# Altium PCB NB3000XN.PcbDoc (part 24 of 71)
Units mil, origin at the board's own origin, x right, y up, seen from the top; angles counter-clockwise.
Board outline 9527.56 x 6929.77 mil, 6 copper layers (Top Layer, GND+SHIELD, MidLayer1, MidLayer2, P2 - 3V3+5V0, Bottom Layer), stack 62.375 mil thick; 832 components, 1027 nets, 4655 pads, 4981 vias.
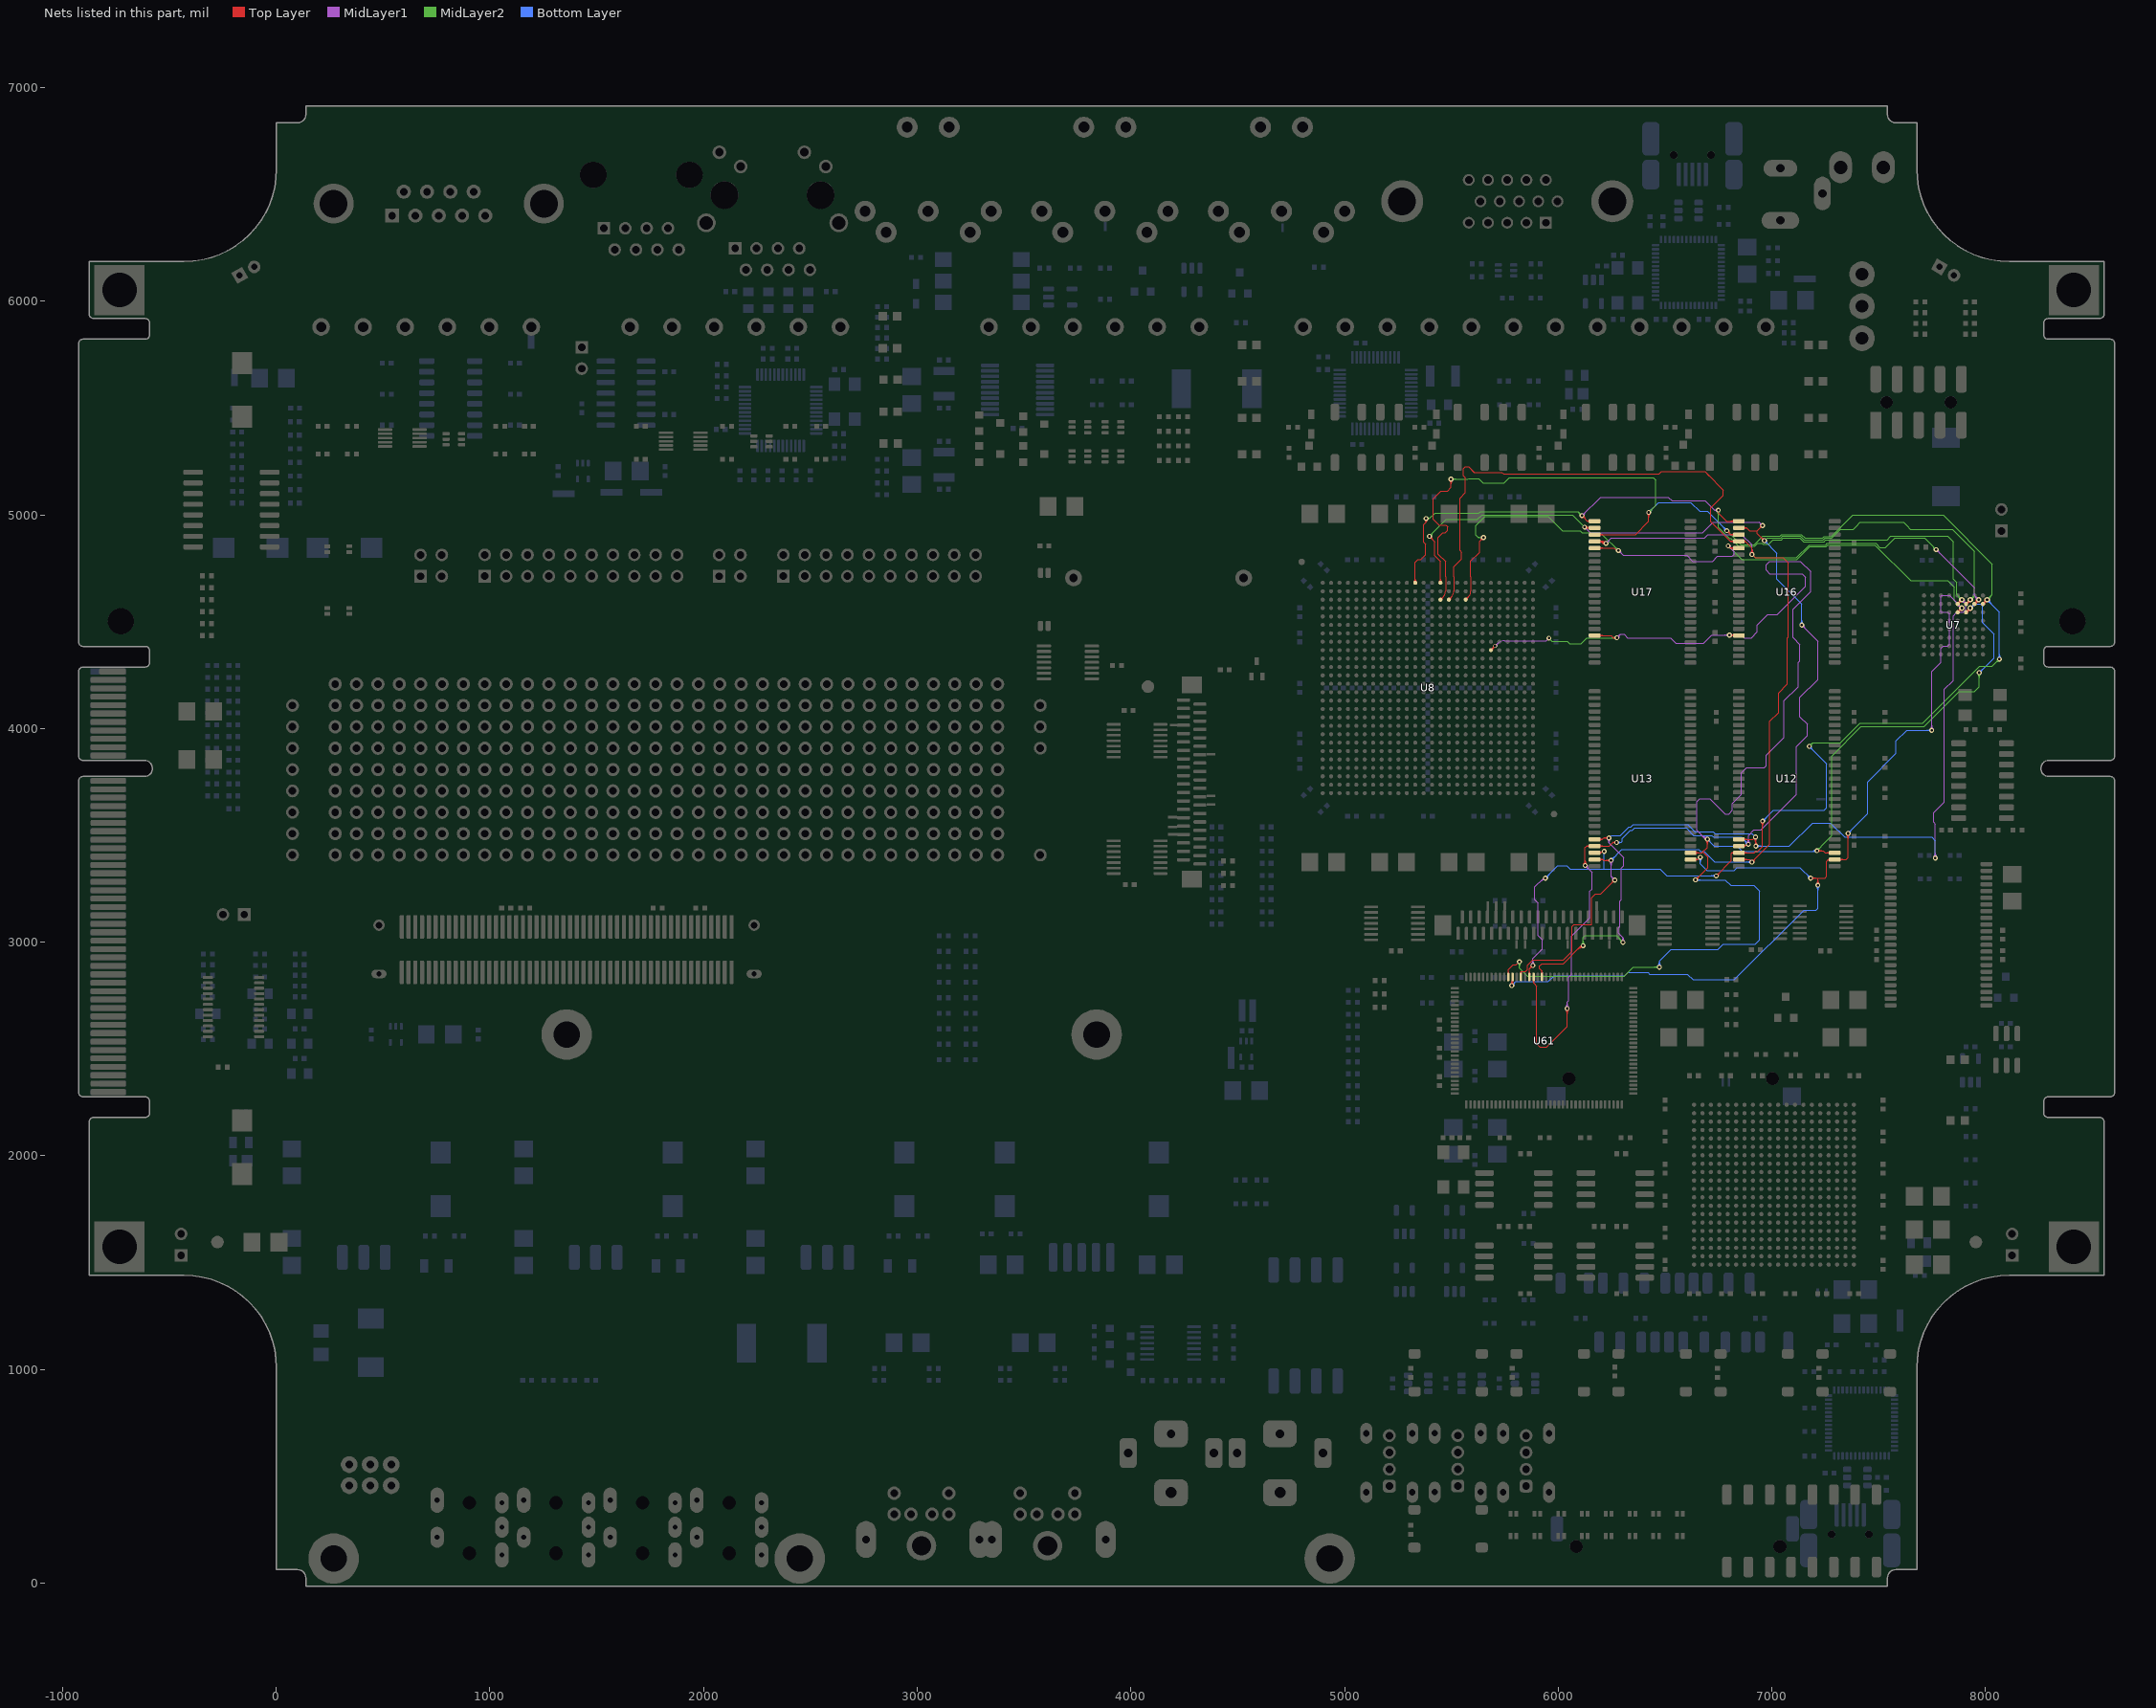
[diagram p28: the nets of this part, all layers, seen from the top]

## Via types
v1: diameter 23, hole 11.81, Top Layer to Bottom Layer, 3672 vias
v2: diameter 26, hole 11.81, Top Layer to Bottom Layer, 461 vias
v3: diameter 19, hole 11.81, Top Layer to Bottom Layer, tented both sides, 396 vias
v4: diameter 23.62, hole 11.81, Top Layer to Bottom Layer, 288 vias
v5: diameter 20, hole 11.81, Top Layer to Bottom Layer, 91 vias
v6: diameter 23, hole 11.81, Top Layer to Bottom Layer, tented both sides, 50 vias
v7: diameter 31, hole 11.81, Top Layer to Bottom Layer, 15 vias
v8: diameter 27.56, hole 11.81, Top Layer to Bottom Layer, tented both sides, 4 vias
v9: diameter 29, hole 11.81, Top Layer to Bottom Layer, 3 vias
v10: diameter 21, hole 11.81, Top Layer to Bottom Layer, 1 vias

## Nets (pads, with @x,y where several pads share a name; then routed paths per layer and width w, separated by ;. In a path a pad name is that pad's centre, name@x,y a point inside that pad or via, vN(x,y) a via of type N, cw(c..) or ccw(c..) an arc to the next point about the centre after c; other vN are vias at no path point) (continued)
DB_MEM.BUS_A2: U7.D2 U8.A12 U12.23 U13.23 U16.1 U17.1 U61.84 | length 9169.9
  Top Layer w4: U8.A12@5325.64,4687.43 ccw(c5312.84,4700.23) 5330.94,4700.23 ccw(c5349.05,4700.23) U8.A12@5336.25,4687.43 ; U8.A12@5325.75,4687.32 ccw(c5313.22,4699.85) 5330.94,4699.85 ccw(c5348.67,4699.85) U8.A12@5336.14,4687.32 ; U8.A12@5330.94,4682.13 5330.94,4710 5330.94,4720 5330.94,4724.74 5330.95,4728.71 5330.95,4778.21 5343.74,4791 5357.13,4791 5379.5,4813.37 5379.5,4863.42 5371.19,4871.73 5371.19,4955.04 5381.86,4965.71 ; v1@5376.62,4975.45 cw(c5370.18,4965.71) 5381.86,4965.71 ; v1(5381.86,4983.37) 5381.86,4965.71 ; v1@5387.1,4975.45 ccw(c5393.53,4965.71) 5381.86,4965.71 ; U61.84@5921.5,2853.36 ccw(c5914.67,2860.19) 5924.33,2860.19 ccw(c5933.99,2860.19) U61.84@5927.16,2853.36 ; U61.84@5924.33,2837.34 5924.33,2864.53 5913.36,2875.5 5913.36,2889.88 5916.78,2893.3 5923.52,2900.04 6024.52,2900.04 6107.86,2983.37 v1(6116.86,2983.37) ; 6085.28,2960.79 cw(c6116.86,2929.21) v1@6116.86,2973.87 ; 6092.1,2967.62 cw(c6116.86,2942.87) v1@6116.86,2977.87 ; 6098.93,2974.45 cw(c6116.86,2956.53) v1@6116.86,2981.87 ; v1@6111.52,4987.21 cw(c6111.52,4964.27) 6127.74,4980.49 cw(c6143.96,4996.71) v1@6121.02,4996.71 ; v1@6111.52,4991.21 cw(c6111.52,4977.93) 6120.91,4987.32 cw(c6130.3,4996.71) v1@6117.02,4996.71 ; v1(6111.52,4996.71) 6137.53,4970.71 ; U17.1@6146.51,4966.07 ccw(c6137.53,4959.68) 6137.53,4970.71 ; U17.1@6146.51,4975.34 cw(c6137.53,4981.73) 6137.53,4970.71 ; U13.23@6170.59,3481.54 6206.35,3481.53 ; U17.1@6170.59,4970.71 6137.53,4970.71 ; U13.23@6194.04,3476.13 cw(c6206.35,3464.83) 6206.35,3481.53 ; U13.23@6194.04,3486.94 ccw(c6206.35,3498.23) 6206.35,3481.53 ; v1@6231.14,3481.32 ccw(c6214.92,3465.11) 6214.92,3488.04 ccw(c6214.92,3510.98) v1@6231.14,3494.76 ; v1@6233.97,3484.15 ccw(c6224.58,3474.76) 6224.58,3488.04 ccw(c6224.58,3501.32) v1@6233.97,3491.93 ; v1(6237.86,3488.04) 6212.86,3488.04 6206.35,3481.53 ; v1(6749.52,5022.37) 6749.52,5008.37 6787.19,4970.71 U16.1@6845.59,4970.71 ; U16.1@6822.37,4965.05 ccw(c6808.72,4951.4) 6808.72,4970.71 ccw(c6808.72,4990.02) U16.1@6822.37,4976.37 ; U12.23@6845.59,3481.54 6912.35,3481.53 v1(6923.52,3492.71) 6923.52,3472 ; U12.23@6868.81,3475.88 cw(c6882.46,3462.22) 6882.46,3481.53 cw(c6882.46,3500.85) U12.23@6868.81,3487.19 ; v1@6917.33,3485.51 cw(c6905.71,3472) 6923.52,3472 ; v1@6919.53,3457.41 ccw(c6909.31,3470) 6925.52,3470 ccw(c6941.74,3470) v1@6931.51,3457.41 ; v1@6919.94,3488.54 cw(c6913.21,3480.72) 6923.52,3480.72 cw(c6933.84,3480.72) v1@6927.11,3488.54 ; v1@6922.06,3454.31 ccw(c6916.14,3461.6) 6925.52,3461.6 ccw(c6934.91,3461.6) v1@6928.99,3454.31 ; v1(6925.52,3450.04) 6925.52,3470 6923.52,3472 ; v1@6929.72,3485.51 ccw(c6941.34,3472) 6923.52,3472
  Top Layer w8: U7.D2@7869.69,4583.43 v2(7889.37,4603.11) ; U7.D2@7869.69,4589.43 ccw(c7869.69,4603.91) 7879.93,4593.67 ccw(c7890.17,4583.43) U7.D2@7875.69,4583.43 ; v2@7880.37,4603.11 cw(c7858.64,4603.11) 7874.01,4587.75 cw(c7889.37,4572.38) v2@7889.37,4594.11
  MidLayer1 w4: v1(6111.52,4996.71) 6198.19,5083.37 6515.19,5083.37 6531.86,5066.71 6687.21,5066.71 6731.54,5022.37 ; v1@6111.52,5002.21 ccw(c6111.52,5015.49) 6120.91,5006.1 ccw(c6130.3,4996.71) v1@6117.02,4996.71 ; v1@6111.52,5006.21 ccw(c6111.52,5029.14) 6127.74,5012.93 ccw(c6143.96,4996.71) v1@6121.02,4996.71 ; v1@6231.14,3481.32 cw(c6214.92,3465.11) 6237.86,3465.11 cw(c6260.79,3465.11) v1@6244.57,3481.32 ; v1@6233.97,3484.15 cw(c6224.58,3474.76) 6237.86,3474.76 cw(c6251.14,3474.76) v1@6241.75,3484.15 ; v1(6237.86,3488.04) 6237.86,3464.69 6307.52,3395.02 6307.52,3358.73 6295.52,3346.73 6295.52,3198.04 6289.19,3191.71 6289.19,3074.04 6281.86,3066.71 6281.86,3041.71 6303.52,3020.04 ; v1@6297.25,3006.18 ccw(c6285.07,3020.04) 6303.52,3020.04 ; v1@6299.89,3003.17 ccw(c6292.84,3011.2) 6303.52,3011.2 ccw(c6314.21,3011.2) v1@6307.16,3003.17 ; v1(6303.52,2999.04) 6303.52,3020.04 ; v1@6309.8,3006.18 cw(c6321.98,3020.04) 6303.52,3020.04 ; v1@6741.68,5017.02 ccw(c6731.54,5010.11) 6731.54,5022.37 ; v1@6741.68,5027.73 cw(c6731.54,5034.64) 6731.54,5022.37 ; v1(6749.52,5022.37) 6731.54,5022.37 ; v1@7758.47,3400.43 ccw(c7742.26,3416.64) 7765.19,3416.64 ccw(c7788.13,3416.64) v1@7771.91,3400.43 ; v1@7761.3,3397.6 ccw(c7751.91,3406.99) 7765.19,3406.99 ccw(c7778.47,3406.99) v1@7769.08,3397.6 ; v1(7765.19,3393.71) 7765.19,3553.69 7756.86,3562.02 7756.86,3606.02 7807.19,3656.35 7807.19,4184.02 7848.52,4225.36 7848.52,4528.04 7865.19,4544.71 7897.52,4544.71 7908.52,4555.71 7908.52,4583.96 v2(7889.37,4603.11) ; v2@7889.37,4592.11 cw(c7889.37,4565.55) 7908.15,4584.33 cw(c7926.93,4603.11) v2@7900.37,4603.11 ; v2@7889.37,4596.11 cw(c7889.37,4579.21) 7901.32,4591.16 cw(c7913.27,4603.11) v2@7896.37,4603.11
  MidLayer2 w4: v1(5381.86,4983.37) 5398.52,4983.37 ; v1@5390.03,4978.53 cw(c5398.52,4973.51) 5398.52,4983.37 ; v1@5390.03,4988.22 ccw(c5398.52,4993.24) 5398.52,4983.37 ; v1@6102.02,4996.71 ccw(c6079.09,4996.71) 6095.31,5012.93 ccw(c6111.52,5029.14) v1@6111.52,5006.21 ; v1@6106.02,4996.71 ccw(c6092.75,4996.71) 6102.14,5006.1 ccw(c6111.52,5015.49) v1@6111.52,5002.21 ; v1@6110.14,2990.09 ccw(c6093.92,3006.31) 6116.86,3006.31 ccw(c6139.79,3006.31) v1@6123.57,2990.09 ; v1(6111.52,4996.71) 6092.03,5016.2 5636.1,5016.2 5628.27,5008.37 5423.52,5008.37 5398.52,4983.37 ; v1@6112.97,2987.26 ccw(c6103.58,2996.65) 6116.86,2996.65 ccw(c6130.14,2996.65) v1@6120.75,2987.26 ; v1(6116.86,2983.37) 6116.86,3021.86 6125,3030 6272.56,3030 v1(6303.52,2999.04) ; v1@6294.02,2999.04 ccw(c6271.09,2999.04) 6287.31,3015.26 ccw(c6303.52,3031.48) v1@6303.52,3008.54 ; v1@6298.02,2999.04 ccw(c6284.75,2999.04) 6294.14,3008.43 ccw(c6303.52,3017.82) v1@6303.52,3004.54 ; v1@6742.81,5015.66 cw(c6726.59,4999.44) 6749.52,4999.44 cw(c6772.46,4999.44) v1@6756.24,5015.66 ; v1@6745.64,5018.49 cw(c6736.25,5009.1) 6749.52,5009.1 cw(c6762.8,5009.1) v1@6753.41,5018.49 ; v1(6749.52,5022.37) 6749.52,4940.71 6801.36,4888.87 6809.4,4888.87 6845.07,4853.21 6920.73,4853.21 6934.23,4866.71 6953.54,4866.71 6957.75,4862.5 6985,4862.5 7006.38,4883.88 7044.62,4883.88 7053.28,4892.54 7130.67,4892.54 7148,4875.21 7244.15,4875.21 7252.15,4883.21 7540.02,4883.21 7540.19,4883.37 7556.86,4900.04 7823.52,4900.04 7848.52,4875.04 7848.52,4700.04 7865.19,4683.37 7865.19,4627.29 v2(7889.37,4603.11) ; v2@7878.37,4603.11 ccw(c7851.82,4603.11) 7870.59,4621.89 ccw(c7889.37,4640.67) v2@7889.37,4614.11 ; v2@7882.37,4603.11 ccw(c7865.47,4603.11) 7877.42,4615.06 ccw(c7889.37,4627.01) v2@7889.37,4610.11
  Bottom Layer w4: v1(6237.86,3488.04) 6249.86,3500.04 6291.19,3500.04 6330.86,3539.71 6340,3539.71 6350.67,3550.37 6606.52,3550.37 6640.19,3516.71 6725.52,3516.71 6733.86,3508.37 6907.86,3508.37 v1(6923.52,3492.71) ; v1(6925.52,3450.04) 7081.86,3450.04 7190.19,3558.37 7273.52,3558.37 7340.19,3491.71 7748.52,3491.71 7765.19,3475.04 v1(7765.19,3393.71) ; v1@6929.41,3446.15 cw(c6938.8,3436.76) 6938.8,3450.04 cw(c6938.8,3463.32) v1@6929.41,3453.93 ; v1@6932.24,3443.32 cw(c6948.46,3427.11) 6948.46,3450.04 cw(c6948.46,3472.98) v1@6932.24,3456.76 ; v1@7758.47,3400.43 ccw(c7742.26,3416.64) 7765.19,3416.64 ccw(c7788.13,3416.64) v1@7771.91,3400.43 ; v1@7761.3,3397.6 ccw(c7751.91,3406.99) 7765.19,3406.99 ccw(c7778.47,3406.99) v1@7769.08,3397.6
DB_MEM.BUS_A3: U7.C2 U8.A15 U12.24 U13.24 U16.2 U17.2 U61.86 | length 8910.3
  Top Layer w4: v1@5397.19,4890.54 cw(c5397.19,4867.61) 5413.41,4883.82 cw(c5429.63,4900.04) v1@5406.69,4900.04 ; v1@5397.19,4894.54 cw(c5397.19,4881.26) 5406.58,4890.65 cw(c5415.97,4900.04) v1@5402.69,4900.04 ; v1(5397.19,4900.04) 5422.5,4874.73 5422.5,4809.73 5449.06,4783.17 5449.06,4720 5449.06,4710 U8.A15@5449.06,4682.13 ; U8.A15@5443.75,4687.43 ccw(c5430.95,4700.23) 5449.06,4700.23 ccw(c5467.16,4700.23) U8.A15@5454.36,4687.43 ; U8.A15@5443.86,4687.32 ccw(c5431.33,4699.85) 5449.06,4699.85 ccw(c5466.78,4699.85) U8.A15@5454.25,4687.32 ; U61.86@5882.13,2821.32 cw(c5875.3,2814.49) 5884.96,2814.49 cw(c5894.62,2814.49) U61.86@5887.79,2821.32 ; U61.86@5884.96,2837.34 5884.96,2808.37 5898.52,2794.81 5898.52,2525.04 5915.19,2508.37 5945.54,2508.37 6041.86,2604.69 v1(6041.86,2689.71) ; v1@6035.14,2682.99 cw(c6018.92,2666.77) 6041.86,2666.77 cw(c6064.79,2666.77) v1@6048.57,2682.99 ; v1@6037.97,2685.82 cw(c6028.58,2676.43) 6041.86,2676.43 cw(c6055.14,2676.43) v1@6045.75,2685.82 ; v1@6119.47,3366.09 ccw(c6103.26,3382.31) 6126.19,3382.31 ccw(c6149.13,3382.31) v1@6132.91,3366.09 ; v1@6122.3,3363.26 ccw(c6112.91,3372.65) 6126.19,3372.65 ccw(c6139.47,3372.65) v1@6130.08,3363.26 ; v1(6123.52,4943.04) 6127.35,4939.21 U17.2@6170.59,4939.21 ; v1@6124.58,4944.1 ccw(c6136.38,4955.9) 6136.38,4939.21 ; v1(6126.19,3359.37) 6126.19,3443.04 6133.19,3450.04 6240.19,3450.04 6256.86,3466.71 ; v1@6127.41,4946.93 ccw(c6146.04,4965.56) U17.2@6146.04,4939.21 ; v1@6130.24,4936.32 cw(c6137.22,4929.34) 6137.22,4939.21 ; v1@6130.24,4949.76 ccw(c6155.7,4975.21) U17.2@6155.7,4939.21 ; U13.24@6147.37,3444.38 ccw(c6133.72,3430.73) 6133.72,3450.04 ccw(c6133.72,3469.35) U13.24@6147.37,3455.7 ; U17.2@6147.37,4933.56 ccw(c6133.72,4919.9) 6133.72,4939.21 ccw(c6133.72,4958.53) U17.2@6147.37,4944.87 ; U13.24@6193.81,3444.38 cw(c6207.46,3430.73) 6207.46,3450.04 cw(c6207.46,3469.35) U13.24@6193.81,3455.7 ; v1@6265.35,3461.87 ccw(c6256.86,3456.84) 6256.86,3466.71 ; v1@6265.35,3471.55 cw(c6256.86,3476.58) 6256.86,3466.71 ; v1(6273.52,3466.71) 6256.86,3466.71 ; U12.24@6845.59,3450.04 6874.19,3450.04 ; U16.2@6845.59,4939.21 6881.15,4939.21 ; U12.24@6863.15,3450.04 ccw(c6868.51,3458.36) 6875.51,3451.36 ; U12.24@6865.32,3453.4 ccw(c6871.26,3462.63) 6879.02,3454.87 ; U12.24@6867.48,3456.77 ccw(c6874.01,3466.89) v1@6882.52,3458.37 ; U16.2@6869.09,4933.85 cw(c6881.15,4922.96) 6881.15,4939.21 ; U16.2@6869.09,4944.57 ccw(c6881.15,4955.46) 6881.15,4939.21 ; U12.24@6870.75,3447.55 cw(c6874.19,3446.42) 6874.19,3450.04 ; U12.24@6870.75,3452.53 ccw(c6874.19,3453.65) 6874.19,3450.04 ; 6874.65,3450.5 cw(c6883.5,3441.64) v1@6888.15,3453.27 ; 6878.94,3454.79 cw(c6885.95,3447.77) v1@6889.63,3456.98 ; v1(6890.19,3458.37) v1@6882.52,3458.37 ; v1@6947.36,4950.04 cw(c6924.42,4950.04) 6940.64,4933.82 cw(c6956.86,4917.61) v1@6956.86,4940.54 ; v1@6951.36,4950.04 cw(c6938.08,4950.04) 6947.47,4940.65 cw(c6956.86,4931.26) v1@6956.86,4944.54 ; v1@6955.5,4880 ccw(c6932.56,4880) 6948.78,4896.22 ccw(c6965,4912.43) v1@6965,4889.5 ; v1(6956.86,4950.04) 6931.86,4925.04 ; v1@6959.5,4880 ccw(c6946.22,4880) 6955.61,4889.39 ccw(c6965,4898.78) v1@6965,4885.5 ; v1(6965,4880) 6931.86,4913.14 6931.86,4925.04 ; 6874.19,3450.04 v1@6882.52,3458.37 ; 6881.15,4939.21 6895.32,4925.04 6931.86,4925.04
  Top Layer w8: U7.C2@7909.06,4583.43 v2(7928.74,4603.11) ; U7.C2@7909.06,4589.43 ccw(c7909.06,4603.91) 7919.3,4593.67 ccw(c7929.54,4583.43) U7.C2@7915.06,4583.43 ; v2@7919.74,4603.11 cw(c7898.01,4603.11) 7913.38,4587.75 cw(c7928.74,4572.38) v2@7928.74,4594.11
  MidLayer1 w4: v1@6035.14,2696.43 ccw(c6018.92,2712.64) 6041.86,2712.64 ccw(c6064.79,2712.64) v1@6048.57,2696.43 ; v1@6037.97,2693.6 ccw(c6028.58,2702.99) 6041.86,2702.99 ccw(c6055.14,2702.99) v1@6045.75,2693.6 ; v1(6041.86,2689.71) 6041.86,2720.75 6048.52,2727.41 6048.52,2835.71 6062.86,2850.04 6062.86,3028.35 6148.52,3114.02 6148.52,3238.67 6158.19,3248.34 6158.19,3327.37 v1(6126.19,3359.37) ; v1@6123.52,4933.54 cw(c6123.52,4910.61) 6139.74,4926.82 cw(c6155.96,4943.04) v1@6133.02,4943.04 ; v1@6123.52,4937.54 cw(c6123.52,4924.26) 6132.91,4933.65 cw(c6142.3,4943.04) v1@6129.02,4943.04 ; v1(6123.52,4943.04) 6149.86,4916.71 6675.88,4916.71 6725.88,4966.71 6940.19,4966.71 v1(6956.86,4950.04) ; v1@6126.19,3349.87 cw(c6126.19,3326.94) 6142.41,3343.16 cw(c6158.63,3359.37) v1@6135.69,3359.37 ; v1@6126.19,3353.87 cw(c6126.19,3340.6) 6135.58,3349.99 cw(c6144.97,3359.37) v1@6131.69,3359.37 ; v1@6883.47,3465.09 ccw(c6867.26,3481.31) 6890.19,3481.31 ccw(c6913.13,3481.31) v1@6896.91,3465.09 ; v1@6886.3,3462.26 ccw(c6876.91,3471.65) 6890.19,3471.65 ccw(c6903.47,3471.65) v1@6894.08,3462.26 ; v1(6890.19,3458.37) 6890.19,3500.04 6915.19,3525.04 6948.52,3525.04 7115.19,3691.71 7115.19,3916.35 7165.52,3966.69 7165.52,4020.79 7131.86,4054.46 7131.86,4146.45 7215.19,4229.79 7215.19,4409.37 v1(7140.19,4484.37) ; v1@6947.36,4950.04 ccw(c6924.42,4950.04) 6940.64,4966.26 ccw(c6956.86,4982.48) v1@6956.86,4959.54 ; v1@6951.36,4950.04 ccw(c6938.08,4950.04) 6947.47,4959.43 ccw(c6956.86,4968.82) v1@6956.86,4955.54 ; v1@7140.19,4474.87 cw(c7140.19,4451.94) 7156.41,4468.16 cw(c7172.63,4484.37) v1@7149.69,4484.37 ; v1@7140.19,4478.87 cw(c7140.19,4465.6) 7149.58,4474.99 cw(c7158.97,4484.37) v1@7145.69,4484.37
  MidLayer2 w4: v1(5397.19,4900.04) 5476.52,4979.37 5621.9,4979.37 5642.73,5000.2 6039.8,5000.2 ; v1@5397.19,4905.54 ccw(c5397.19,4918.82) 5406.58,4909.43 ccw(c5415.97,4900.04) v1@5402.69,4900.04 ; v1@5397.19,4909.54 ccw(c5397.19,4932.48) 5413.41,4916.26 ccw(c5429.63,4900.04) v1@5406.69,4900.04 ; 6040,5000 6039.8,5000.2 ; v1(6123.52,4943.04) 6066.36,5000.2 6039.8,5000.2 ; v1(6965,4880) 6978.04,4893.04 7042.47,4893.04 7049.97,4900.54 7133.98,4900.54 7151.31,4883.21 7240.84,4883.21 7248.84,4891.21 7281.26,4891.21 7322.09,4932.04 7380.52,4932.04 7398.52,4950.04 ; 7396.8,4948.32 7413.48,4965 7616.9,4965 7631.86,4950.04 7648.52,4933.37 7845.54,4933.37 7948.52,4830.39 7948.52,4622.89 v2(7928.74,4603.11) ; v2@7928.74,4610.11 ccw(c7928.74,4627.01) 7940.69,4615.06 ccw(c7952.64,4603.11) v2@7935.74,4603.11 ; v2@7928.74,4614.11 ccw(c7928.74,4640.67) 7947.52,4621.89 ccw(c7966.3,4603.11) v2@7939.74,4603.11
  Bottom Layer w4: v1(6273.52,3466.71) 6295.52,3466.71 ; v1@6277.53,3462.94 cw(c6286.26,3454.71) 6286.26,3466.71 cw(c6286.26,3478.7) v1@6277.53,3470.48 ; v1@6280.44,3460.19 cw(c6295.52,3445.99) 6295.52,3466.71 ; v1@6280.44,3473.22 ccw(c6295.52,3487.43) 6295.52,3466.71 ; v1@6880.69,3458.37 ccw(c6857.76,3458.37) 6873.97,3474.59 ccw(c6890.19,3490.81) v1@6890.19,3467.87 ; v1@6884.69,3458.37 ccw(c6871.41,3458.37) 6880.8,3467.76 ccw(c6890.19,3477.15) v1@6890.19,3463.87 ; v1(6890.19,3458.37) 6856.86,3491.71 6727.9,3491.71 6719.56,3500.04 6634.23,3500.04 6599.9,3534.37 6357.29,3534.37 6346.63,3523.71 6337.48,3523.71 6300.21,3486.43 6300.21,3471.39 6295.52,3466.71 ; v1@6965,4870.5 cw(c6965,4847.56) 6981.22,4863.78 cw(c6997.43,4880) v1@6974.5,4880 ; v1(6965,4880) 7023.52,4821.48 7023.52,4700.37 7140.19,4583.71 v1(7140.19,4484.37) ; v1@7133.47,4491.09 ccw(c7117.26,4507.31) 7140.19,4507.31 ccw(c7163.13,4507.31) v1@7146.91,4491.09 ; v1@7136.3,4488.26 ccw(c7126.91,4497.65) 7140.19,4497.65 ccw(c7153.47,4497.65) v1@7144.08,4488.26 ; 6974.39,4870.61 cw(c6983.78,4880) 6970.5,4880 ccw(c6983.78,4880) 6974.39,4870.61 ; 6974.39,4870.61 ccw(c6965,4861.22) 6965,4874.5 cw(c6965,4861.22) 6974.39,4870.61
DB_MEM.BUS_A4: U7.A2 U8.C15 U12.25 U13.25 U16.3 U17.3 U61.87 | length 9796.5
  Top Layer w4: U8.C15@5449.06,4610.73 ccw(c5449.06,4628.45) 5461.59,4615.92 ; U8.C15@5456.4,4603.39 cw(c5474.12,4603.39) 5461.59,4615.92 ; 5472.92,4773.31 5472.92,4765 ; v1@5491.81,5160.99 cw(c5475.59,5144.77) 5498.52,5144.77 cw(c5521.46,5144.77) v1@5505.24,5160.99 ; v1@5494.64,5163.82 cw(c5485.25,5154.43) 5498.52,5154.43 cw(c5511.8,5154.43) v1@5502.41,5163.82 ; v1@5498.52,5158.37 v1(5498.52,5167.71) 5498.52,5128.52 5481.75,5111.75 5451.9,5111.75 5415.19,5075.04 5415.19,4978.71 5441.52,4952.37 5441.65,4952.5 5474.4,4952.5 5474.52,4952.37 5481.86,4945.04 5482.5,4944.4 5482.5,4927.75 5470.75,4916 5461.15,4916 5438.86,4893.71 5438.86,4816 5472.92,4781.94 5472.92,4765 ; U61.87@5862.45,2853.36 ccw(c5855.82,2859.98) 5865.19,2859.98 ; 5864.86,2874.71 cw(c5881.36,2858.2) v1@5881.71,2881.54 ; U61.87@5865.19,2850.53 5865.19,2875.04 5881.19,2891.04 v1(5881.86,2891.04) ; 5865.19,2860.39 ccw(c5875.14,2860.39) U61.87@5868.1,2853.36 ; 5866.11,2875.96 ccw(c5851.03,2891.04) v1@5872.36,2891.04 ; 5871.54,2881.39 cw(c5881.56,2871.38) v1@5881.77,2885.54 ; 5872.94,2882.79 ccw(c5864.69,2891.04) v1@5876.36,2891.04 ; U13.25@6170.59,3418.54 6200,3418.54 ; U17.3@6170.59,4907.72 6361.55,4907.72 6423.86,4970.02 v1(6423.86,5012.04) ; U13.25@6188.15,3418.54 ccw(c6194.06,3425.34) 6200.43,3418.97 ; U13.25@6190.77,3421.56 ccw(c6196.88,3428.59) 6203.46,3422.01 ; U13.25@6193.4,3424.58 ccw(c6199.7,3431.84) v1@6206.5,3425.04 ; U17.3@6193.81,4902.06 cw(c6207.46,4888.4) 6207.46,4907.72 cw(c6207.46,4927.03) U17.3@6193.81,4913.37 ; U13.25@6195.57,3415.55 cw(c6200,3413.77) 6200,3418.54 ; U13.25@6195.57,3421.53 ccw(c6200,3423.32) 6200,3418.54 ; v1(6215.19,3425.04) v1@6206.5,3425.04 ; v1@6417.14,5005.32 cw(c6400.92,4989.11) 6423.86,4989.11 cw(c6446.79,4989.11) v1@6430.57,5005.32 ; v1@6419.97,5008.15 cw(c6410.58,4998.76) 6423.86,4998.76 cw(c6437.14,4998.76) v1@6427.75,5008.15 ; v1(6740.19,3310.71) 6811.52,3382.04 6811.52,3416.88 6813.19,3418.54 ; v1@6740.19,3316.21 ccw(c6740.19,3329.49) 6749.58,3320.1 ccw(c6758.97,3310.71) v1@6745.69,3310.71 ; v1@6740.19,3320.21 ccw(c6740.19,3343.14) 6756.41,3326.93 ccw(c6772.63,3310.71) v1@6749.69,3310.71 ; v1@6789.52,4916.87 cw(c6789.52,4893.94) 6805.74,4910.16 cw(c6821.96,4926.37) v1@6799.02,4926.37 ; v1@6789.52,4920.87 cw(c6789.52,4907.6) 6798.91,4916.99 cw(c6808.3,4926.37) v1@6795.02,4926.37 ; v1(6789.52,4926.37) 6808.18,4907.72 U16.3@6845.59,4907.72 ; U12.25@6821.35,3422.94 cw(c6813.19,3428.31) 6813.19,3418.54 ; U12.25@6821.35,3414.15 ccw(c6813.19,3408.78) 6813.19,3418.54 ; U16.3@6822.37,4902.06 ccw(c6808.72,4888.4) 6808.72,4907.72 ccw(c6808.72,4927.03) U16.3@6822.37,4913.37 ; U12.25@6868.81,3412.89 cw(c6882.46,3399.23) 6882.46,3418.54 cw(c6882.46,3437.86) U12.25@6868.81,3424.2 ; v1@6950.14,3559.99 cw(c6933.92,3543.77) 6956.86,3543.77 cw(c6979.79,3543.77) v1@6963.57,3559.99 ; v1@6952.97,3562.82 cw(c6943.58,3553.43) 6956.86,3553.43 cw(c6970.14,3553.43) v1@6960.75,3562.82 ; v1(6956.86,3566.71) 6956.86,3448.37 6933.52,3425.04 6923.52,3425.04 6917.03,3418.54 U12.25@6845.59,3418.54 6813.19,3418.54 ; 5461.59,4615.92 ccw(c5434.24,4643.27) 5472.92,4643.27 5472.92,4710 5472.92,4720 5472.92,4765 ; 6200,3418.54 v1@6206.5,3425.04
  Top Layer w8: U7.A2@7987.8,4583.43 v2(8007.48,4603.11) ; U7.A2@7987.8,4589.43 ccw(c7987.8,4603.91) 7998.04,4593.67 ccw(c8008.28,4583.43) U7.A2@7993.8,4583.43 ; v2@7998.48,4603.11 cw(c7976.75,4603.11) 7992.12,4587.75 cw(c8007.48,4572.38) v2@8007.48,4594.11
  MidLayer1 w4: v1@5875.14,2897.76 ccw(c5858.92,2913.98) 5881.86,2913.98 ccw(c5904.79,2913.98) v1@5888.57,2897.76 ; v1@5877.97,2894.93 ccw(c5868.58,2904.32) 5881.86,2904.32 ccw(c5895.14,2904.32) v1@5885.75,2894.93 ; v1(5881.86,2891.04) 5881.86,2923.37 5926.19,2967.71 5926.19,3011.06 5906.19,3031.06 5906.19,3182.67 5890.86,3198 5890.86,3259.04 5931.86,3300.04 v1(5940.19,3300.04) ; 5909.75,3277.93 cw(c5940.19,3247.49) v1@5940.19,3290.54 ; 5916.58,3284.76 cw(c5940.19,3261.14) v1@5940.19,3294.54 ; 5923.4,3291.59 cw(c5940.19,3274.8) v1@5940.19,3298.54
  MidLayer2 w4: v1(5498.52,5167.71) 5577.71,5167.71 5580,5170 5628.56,5170 5648.52,5150.04 5746.86,5150.04 5771.86,5175.04 6445.54,5175.04 6457.19,5163.39 6457.19,5045.37 v1(6423.86,5012.04) ; v1@5502.41,5163.82 cw(c5511.8,5154.43) 5511.8,5167.71 cw(c5511.8,5180.99) v1@5502.41,5171.6 ; v1@5505.24,5160.99 cw(c5521.46,5144.77) 5521.46,5167.71 cw(c5521.46,5190.64) v1@5505.24,5174.43 ; v1@6423.86,5017.54 ccw(c6423.86,5030.82) 6433.25,5021.43 ccw(c6442.64,5012.04) v1@6429.36,5012.04 ; v1@6423.86,5021.54 ccw(c6423.86,5044.48) 6440.07,5028.26 ccw(c6456.29,5012.04) v1@6433.36,5012.04 ; v1@6789.52,4916.87 cw(c6789.52,4893.94) 6805.74,4910.16 cw(c6821.96,4926.37) v1@6799.02,4926.37 ; v1@6789.52,4920.87 cw(c6789.52,4907.6) 6798.91,4916.99 cw(c6808.3,4926.37) v1@6795.02,4926.37 ; v1(6789.52,4926.37) 6854.69,4861.21 6917.42,4861.21 6957.25,4901.04 7039.15,4901.04 ; v1(7174.86,3916.71) 7191.52,3933.37 7295,3933.37 7306.86,3933.37 7320.54,3933.37 7412.21,4025.04 7460,4025.04 7706.86,4025.04 7973.52,4291.71 8031.86,4291.71 v1(8065.19,4325.04) ; v1@7174.86,3922.21 ccw(c7174.86,3935.49) 7184.25,3926.1 ccw(c7193.64,3916.71) v1@7180.36,3916.71 ; v1@7174.86,3926.21 ccw(c7174.86,3949.14) 7191.07,3932.93 ccw(c7207.29,3916.71) v1@7184.36,3916.71 ; v2(8007.48,4603.11) 8031.86,4627.49 8031.86,4769.69 7801.5,5000.04 7378.78,5000.04 7277.94,4899.21 7245.52,4899.21 7237.52,4891.21 7154.63,4891.21 7137.29,4908.54 7046.65,4908.54 7041.11,4903 ; v2@8007.48,4610.11 ccw(c8007.48,4627.01) 8019.43,4615.06 ccw(c8031.38,4603.11) v2@8014.48,4603.11 ; v2@8007.48,4614.11 ccw(c8007.48,4640.67) 8026.26,4621.89 ccw(c8045.03,4603.11) v2@8018.48,4603.11 ; v1@8055.69,4325.04 cw(c8032.76,4325.04) 8048.97,4308.82 cw(c8065.19,4292.61) v1@8065.19,4315.54 ; v1@8059.69,4325.04 cw(c8046.41,4325.04) 8055.8,4315.65 cw(c8065.19,4306.26) v1@8065.19,4319.54 ; 7039.15,4901.04 7041.11,4903 ; 7039.15,4901.04 7041.11,4903
  Bottom Layer w4: v1(5940.19,3300.04) 5998.52,3358.37 6040.19,3358.37 6056.86,3341.71 6215.19,3341.71 ; v1@5940.19,3305.54 ccw(c5940.19,3318.82) 5949.58,3309.43 ccw(c5958.97,3300.04) v1@5945.69,3300.04 ; v1@5940.19,3309.54 ccw(c5940.19,3332.48) 5956.41,3316.26 ccw(c5972.63,3300.04) v1@5949.69,3300.04 ; v1(6215.19,3425.04) 6215.19,3341.71 ; v1(6423.86,5012.04) 6470.19,5058.37 6621.21,5058.37 6662.88,5016.71 6699.19,5016.71 v1(6789.52,4926.37) ; v1@6423.86,5017.54 ccw(c6423.86,5030.82) 6433.25,5021.43 ccw(c6442.64,5012.04) v1@6429.36,5012.04 ; v1@6423.86,5021.54 ccw(c6423.86,5044.48) 6440.07,5028.26 ccw(c6456.29,5012.04) v1@6433.36,5012.04 ; v1@6733.47,3303.99 ccw(c6717.26,3287.77) 6717.26,3310.71 ccw(c6717.26,3333.64) v1@6733.47,3317.43 ; v1@6736.3,3306.82 ccw(c6726.91,3297.43) 6726.91,3310.71 ccw(c6726.91,3323.99) v1@6736.3,3314.6 ; v1(6740.19,3310.71) 6508.61,3310.71 6477.61,3341.71 6215.19,3341.71 ; v1@6780.02,4926.37 ccw(c6757.09,4926.37) 6773.31,4942.59 ccw(c6789.52,4958.81) v1@6789.52,4935.87 ; v1@6784.02,4926.37 ccw(c6770.75,4926.37) 6780.14,4935.76 ccw(c6789.52,4945.15) v1@6789.52,4931.87 ; v1(6956.86,3566.71) 7006.86,3616.71 7245.54,3616.71 7257.19,3628.35 7257.19,3834.37 v1(7174.86,3916.71) ; v1@6956.86,3572.21 ccw(c6956.86,3585.49) 6966.25,3576.1 ccw(c6975.64,3566.71) v1@6962.36,3566.71 ; v1@6956.86,3576.21 ccw(c6956.86,3599.14) 6973.07,3582.93 ccw(c6989.29,3566.71) v1@6966.36,3566.71 ; v1@7174.86,3907.21 cw(c7174.86,3884.27) 7191.07,3900.49 cw(c7207.29,3916.71) v1@7184.36,3916.71 ; v1@7174.86,3911.21 cw(c7174.86,3897.93) 7184.25,3907.32 cw(c7193.64,3916.71) v1@7180.36,3916.71 ; v2@8007.48,4592.11 cw(c8007.48,4565.55) 8026.26,4584.33 cw(c8045.04,4603.11) v2@8018.48,4603.11 ; v2@8007.48,4596.11 cw(c8007.48,4579.21) 8019.43,4591.16 cw(c8031.38,4603.11) v2@8014.48,4603.11 ; v2(8007.48,4603.11) 8065.19,4545.4 v1(8065.19,4325.04) ; v1@8058.47,4331.76 ccw(c8042.26,4347.98) 8065.19,4347.98 ccw(c8088.13,4347.98) v1@8071.91,4331.76 ; v1@8061.3,4328.93 ccw(c8051.91,4338.32) 8065.19,4338.32 ccw(c8078.47,4338.32) v1@8069.08,4328.93
DB_MEM.BUS_A5: U7.B2 U8.C16 U12.26 U13.26 U16.4 U17.4 U61.89 | length 9055.1
  Top Layer w4: U8.C16@5488.43,4610.73 ccw(c5488.43,4628.45) 5500.96,4615.92 ; U8.C16@5495.77,4603.39 cw(c5513.49,4603.39) 5500.96,4615.92 ; 5606.86,5199.37 5581.19,5225.04 ; 5770.63,5191.37 5791,5191.37 ; U61.89@5823.08,2853.36 ccw(c5816.25,2860.19) 5825.91,2860.19 ccw(c5835.56,2860.19) U61.89@5828.73,2853.36 ; U61.89@5825.9,2837.34 5825.91,2861.71 5827.57,2863.37 5848.52,2863.37 5856.86,2871.71 5856.86,2891.71 5881.86,2916.71 6025.19,2916.71 6065.19,2956.71 6065.19,3073.71 6073.52,3082.04 6155.19,3082.04 6156.86,3083.71 6156.86,3208.37 6173.52,3225.04 6199.52,3225.04 v1(6265.19,3290.71) ; U13.26@6170.59,3387.05 6209.53,3387.05 6213.2,3383.37 v1(6247.52,3383.37) ; U17.4@6170.59,4876.22 6214.01,4876.22 v1(6223.52,4866.71) ; U17.4@6177.63,4876.22 cw(c6177.63,4820.81) v1@6216.81,4859.99 ; U17.4@6187.28,4876.22 cw(c6187.28,4830.47) v1@6219.64,4862.82 ; U13.26@6193.81,3381.39 cw(c6207.46,3367.73) 6207.46,3387.05 cw(c6207.46,3406.36) U13.26@6193.81,3392.7 ; U17.4@6193.81,4870.56 cw(c6207.46,4856.91) 6207.46,4876.22 cw(c6207.46,4895.53) U17.4@6193.81,4881.88 ; U17.4@6196.94,4876.22 cw(c6196.94,4840.12) v1@6222.46,4865.65 ; 6206.6,4876.22 cw(c6206.6,4849.78) v1@6225.29,4868.48 ; v1@6240.81,3376.66 ccw(c6224.59,3360.44) 6224.59,3383.37 ccw(c6224.59,3406.31) v1@6240.81,3390.09 ; v1@6243.64,3379.49 ccw(c6234.25,3370.1) 6234.25,3383.37 ccw(c6234.25,3396.65) v1@6243.64,3387.26 ; v1@6255.69,3290.71 cw(c6232.76,3290.71) 6248.97,3274.49 cw(c6265.19,3258.27) v1@6265.19,3281.21 ; v1@6259.69,3290.71 cw(c6246.41,3290.71) 6255.8,3281.32 cw(c6265.19,3271.93) v1@6265.19,3285.21 ; 6697.52,5191.71 6773.52,5115.71 6773.52,5090.37 6715.19,5032.04 6715.19,4967.89 6806.86,4876.22 U16.4@6845.59,4876.22 6876.35,4876.22 ; 6706.29,5182.94 6686.52,5202.71 6526.82,5202.71 6505,5202.71 6483.37,5202.71 6472.04,5191.37 5791,5191.37 ; U16.4@6822.37,4870.56 ccw(c6808.72,4856.91) 6808.72,4876.22 ccw(c6808.72,4895.53) U16.4@6822.37,4881.88 ; U12.26@6845.59,3387.05 6894.86,3387.05 v1(6906.86,3375.04) 6990.19,3458.37 6990.19,4033.37 7031.86,4075.04 7031.86,4166.71 7073.52,4208.37 7073.52,4425.04 7076.86,4428.37 7076.86,4775.04 7051.86,4800.04 6921.86,4800.04 v1(6906.86,4815.04) 6906.86,4845.71 6876.35,4876.22 ; U12.26@6868.81,3381.39 cw(c6882.46,3367.73) 6882.46,3387.05 cw(c6882.46,3406.36) U12.26@6868.81,3392.7 ; U16.4@6870.24,4872.52 cw(c6876.34,4869.34) 6876.34,4876.22 ; U16.4@6870.24,4879.92 ccw(c6876.34,4883.1) 6876.34,4876.22 ; v1@6900.14,4821.76 ccw(c6883.92,4837.98) 6906.86,4837.98 ccw(c6929.79,4837.98) v1@6913.57,4821.76 ; v1@6902.97,4818.93 ccw(c6893.58,4828.32) 6906.86,4828.32 ccw(c6920.14,4828.32) v1@6910.75,4818.93 ; v1@6906.86,3380.54 ccw(c6906.86,3393.82) 6916.25,3384.43 ccw(c6925.64,3375.04) v1@6912.36,3375.04 ; v1@6906.86,3384.54 ccw(c6906.86,3407.48) 6923.07,3391.26 ccw(c6939.29,3375.04) v1@6916.36,3375.04 ; 5500.96,4615.92 ccw(c5473.61,4643.27) 5512.29,4643.27 5512.29,4710 5512.29,4720 5512.29,4724.74 5512.29,4756.71 5548.52,4792.94 5548.52,4825.04 5540.19,4833.37 5540.19,5078.33 5540.52,5078.33 5566.52,5104.33 5566.52,5173.48 5556.86,5183.14 5556.86,5217.37 5564.52,5225.04 5581.19,5225.04 ; 5581.19,5225.04 5607.23,5199 5736.65,5199 5744.27,5191.37 5791,5191.37
  Top Layer w8: U7.B2@7948.43,4583.43 v2(7968.11,4603.11) ; U7.B2@7948.43,4589.43 ccw(c7948.43,4603.91) 7958.67,4593.67 ccw(c7968.91,4583.43) U7.B2@7954.43,4583.43 ; v2@7959.11,4603.11 cw(c7937.38,4603.11) 7952.75,4587.75 cw(c7968.11,4572.38) v2@7968.11,4594.11
  MidLayer1 w4: v1(6223.52,4866.71) 6248.52,4891.71 6684.84,4891.71 6701.51,4908.37 6858.19,4908.37 6906.86,4859.71 v1(6906.86,4815.04) ; v1@6223.52,4872.21 ccw(c6223.52,4885.49) 6232.91,4876.1 ccw(c6242.3,4866.71) v1@6229.02,4866.71 ; v1@6223.52,4876.21 ccw(c6223.52,4899.14) 6239.74,4882.93 ccw(c6255.96,4866.71) v1@6233.02,4866.71 ; v1@6240.81,3376.66 cw(c6224.59,3360.44) 6247.52,3360.44 cw(c6270.46,3360.44) v1@6254.24,3376.66 ; v1@6243.64,3379.49 cw(c6234.25,3370.1) 6247.52,3370.1 cw(c6260.8,3370.1) v1@6251.41,3379.49 ; v1(6247.52,3383.37) 6247.52,3308.37 v1(6265.19,3290.71) ; v1@6255.69,3290.71 ccw(c6232.76,3290.71) 6248.97,3306.93 ccw(c6265.19,3323.14) v1@6265.19,3300.21 ; v1@6259.69,3290.71 ccw(c6246.41,3290.71) 6255.8,3300.1 ccw(c6265.19,3309.49) v1@6265.19,3296.21 ; v1@6900.14,4821.76 ccw(c6883.92,4837.98) 6906.86,4837.98 ccw(c6929.79,4837.98) v1@6913.57,4821.76 ; v1@6902.97,4818.93 ccw(c6893.58,4828.32) 6906.86,4828.32 ccw(c6920.14,4828.32) v1@6910.75,4818.93 ; v1@7769.19,4828.21 cw(c7769.19,4805.27) 7785.41,4821.49 cw(c7801.63,4837.71) v1@7778.69,4837.71 ; v1@7769.19,4832.21 cw(c7769.19,4818.93) 7778.58,4828.32 cw(c7787.97,4837.71) v1@7774.69,4837.71 ; v1(7769.19,4837.71) 7948.52,4658.37 7948.52,4622.7 v2(7968.11,4603.11) ; v2@7957.11,4603.11 ccw(c7930.55,4603.11) 7949.33,4621.89 ccw(c7968.11,4640.67) v2@7968.11,4614.11 ; v2@7961.11,4603.11 ccw(c7944.21,4603.11) 7956.16,4615.06 ccw(c7968.11,4627.01) v2@7968.11,4610.11
  MidLayer2 w4: v1(6906.86,4815.04) 6922.4,4799.5 7114.8,4799.5 7174.51,4859.21 7250.78,4859.21 7257.94,4866.37 7486.5,4866.37 7505.69,4847.19 7532.38,4847.19 7576.9,4891.71 7715.19,4891.71 v1(7769.19,4837.71) ; v1@7759.69,4837.71 ccw(c7736.76,4837.71) 7752.97,4853.93 ccw(c7769.19,4870.14) v1@7769.19,4847.21 ; v1@7763.69,4837.71 ccw(c7750.41,4837.71) 7759.8,4847.1 ccw(c7769.19,4856.49) v1@7769.19,4843.21
  Bottom Layer w4: v1(6247.52,3383.37) 6297.52,3433.37 6657.52,3433.37 6665.85,3425.04 6682.52,3425.04 6732.52,3375.04 v1(6906.86,3375.04) ; v1@6247.52,3388.87 ccw(c6247.52,3402.15) 6256.91,3392.76 ccw(c6266.3,3383.37) v1@6253.02,3383.37 ; v1@6247.52,3392.87 ccw(c6247.52,3415.81) 6263.74,3399.59 ccw(c6279.96,3383.37) v1@6257.02,3383.37 ; v1@6900.14,3368.32 ccw(c6883.92,3352.11) 6883.92,3375.04 ccw(c6883.92,3397.98) v1@6900.14,3381.76 ; v1@6902.97,3371.15 ccw(c6893.58,3361.76) 6893.58,3375.04 ccw(c6893.58,3388.32) v1@6902.97,3378.93
DB_MEM.BUS_A6: U7.D3 U8.C18 U12.29 U13.29 U16.5 U17.5 U61.91 | length 9078.4
  Top Layer w4: U8.C18@5567.17,4610.73 ccw(c5567.17,4628.45) 5579.7,4615.92 ; U8.C18@5574.51,4603.39 cw(c5592.23,4603.39) 5579.7,4615.92 ; v1@5641.02,4894.04 cw(c5618.09,4894.04) 5634.31,4877.82 cw(c5650.52,4861.61) v1@5650.52,4884.54 ; v1@5645.02,4894.04 cw(c5631.75,4894.04) 5641.13,4884.65 cw(c5650.52,4875.26) v1@5650.52,4888.54 ; v1(5650.52,4894.04) 5631.86,4875.37 5631.86,4825.54 5591.03,4784.71 5591.03,4724.74 5591.03,4720 5591.03,4710 5591.03,4643.27 cw(c5552.35,4643.27) 5579.7,4615.92 ; v1@5775.97,2803.52 ccw(c5750.47,2829.02) U61.91@5786.54,2829.02 ; v1@5778.8,2800.69 ccw(c5760.13,2819.36) U61.91@5786.54,2819.36 ; v1@5781.63,2797.86 ccw(c5769.79,2809.7) 5786.54,2809.7 ; v1(5782.69,2796.8) 5782.69,2800.54 5786.54,2804.39 U61.91@5786.53,2837.34 ; U61.91@5783.71,2821.32 cw(c5776.88,2814.49) 5786.54,2814.49 cw(c5796.19,2814.49) U61.91@5789.36,2821.32 ; 5786.54,2810.45 ccw(c5796.34,2810.45) v1@5789.41,2803.52 ; U17.5@6170.59,4844.72 6262.18,4844.72 6273.52,4833.37 v1(6281.86,4833.37) ; U17.5@6193.81,4839.07 cw(c6207.46,4825.41) 6207.46,4844.72 cw(c6207.46,4864.04) U17.5@6193.81,4850.38 ; 6266.34,4840.56 ccw(c6270.98,4845.2) v1@6275.43,4840.37 ; 6269.29,4837.61 ccw(c6273.81,4842.13) v1@6278.13,4837.42 ; U13.29@6619.41,3387.05 6654.53,3387.05 ; U13.29@6643,3381.8 cw(c6654.53,3371.77) 6654.53,3387.05 ; U13.29@6643.01,3392.3 ccw(c6654.53,3402.32) 6654.53,3387.05 ; v1(6665.19,3397.71) 6654.53,3387.05 ; v1(6795.52,4855.37) 6806.18,4844.72 U16.5@6845.59,4844.72 ; U16.5@6822.37,4839.07 ccw(c6808.72,4825.41) 6808.72,4844.72 ccw(c6808.72,4864.04) U16.5@6822.37,4850.38 ; v1(7181.86,3300.04) 7215.19,3300.04 ; v1@7185.75,3296.15 cw(c7195.14,3286.76) 7195.14,3300.04 cw(c7195.14,3313.32) v1@7185.75,3303.93 ; v1@7188.57,3293.32 cw(c7204.79,3277.11) 7204.79,3300.04 cw(c7204.79,3322.98) v1@7188.57,3306.76 ; v1@7208.47,3273.43 ccw(c7192.26,3289.64) 7215.19,3289.64 ccw(c7238.13,3289.64) v1@7221.91,3273.43 ; v1@7211.3,3270.6 ccw(c7201.91,3279.99) 7215.19,3279.99 ccw(c7228.47,3279.99) v1@7219.08,3270.6 ; v1(7215.19,3266.71) 7215.19,3300.04 ; 7255.71,3377.9 cw(c7270.29,3363.33) U12.29@7275.78,3383.19 ; 7258.86,3381.05 cw(c7265.2,3374.71) U12.29@7271.36,3381.23 ; 7260.57,3382.76 cw(c7272.39,3370.93) 7276.85,3387.05 ccw(c7270.86,3380.7) 7264.68,3386.87 ; 7261.77,3383.96 cw(c7268.03,3377.7) U12.29@7274.1,3384.14 ; 7265.42,3387.61 cw(c7274.49,3378.53) U12.29@7277.92,3390.9 ; U12.29@7269.46,3383.97 ccw(c7264.86,3382.06) 7264.86,3387.05 ; U12.29@7269.46,3390.12 cw(c7264.86,3392.04) 7264.86,3387.05 ; U12.29@7317.63,3381.39 cw(c7331.28,3367.73) 7331.28,3387.05 cw(c7331.28,3406.36) U12.29@7317.63,3392.7 ; v1@7350.14,3502.66 cw(c7333.92,3486.44) 7356.86,3486.44 cw(c7379.79,3486.44) v1@7363.57,3502.66 ; v1@7352.97,3505.49 cw(c7343.58,3496.1) 7356.86,3496.1 cw(c7370.14,3496.1) v1@7360.75,3505.49 ; v1(7356.86,3509.37) 7356.86,3395.37 7348.53,3387.05 U12.29@7294.41,3387.05 7264.86,3387.05 ; 7215.19,3300.04 7248.52,3300.04 7256.86,3308.37 7256.86,3379.05 7264.86,3387.05
  Top Layer w8: U7.D3@7869.69,4544.06 v2(7889.37,4563.74) ; U7.D3@7869.69,4550.06 ccw(c7869.69,4564.54) 7879.93,4554.3 ccw(c7890.17,4544.06) U7.D3@7875.69,4544.06 ; v2@7880.37,4563.74 cw(c7858.64,4563.74) 7874.01,4548.38 cw(c7889.37,4533.01) v2@7889.37,4554.74
  MidLayer1 w4: v1@6281.86,4823.87 cw(c6281.86,4800.94) 6298.07,4817.16 cw(c6314.29,4833.37) v1@6291.36,4833.37 ; v1@6281.86,4827.87 cw(c6281.86,4814.6) 6291.25,4823.99 cw(c6300.64,4833.37) v1@6287.36,4833.37 ; v1(6281.86,4833.37) 6304.86,4810.37 6601.52,4810.37 6628.52,4783.37 6722.52,4783.37 6746.52,4807.37 6815.19,4807.37 6823.52,4815.71 6823.52,4827.37 v1(6795.52,4855.37) ; v1@6795.52,4845.87 cw(c6795.52,4822.94) 6811.74,4839.16 cw(c6827.96,4855.37) v1@6805.02,4855.37 ; v1@6795.52,4849.87 cw(c6795.52,4836.6) 6804.91,4845.99 cw(c6814.3,4855.37) v1@6801.02,4855.37 ; v1@7741.81,3998.43 ccw(c7725.59,4014.64) 7748.52,4014.64 ccw(c7771.46,4014.64) v1@7755.24,3998.43 ; v1@7744.64,3995.6 ccw(c7735.25,4004.99) 7748.52,4004.99 ccw(c7761.8,4004.99) v1@7752.41,3995.6 ; v1(7748.52,3991.71) 7748.52,4266.71 7790.86,4309.04 7790.86,4375.04 7802.52,4386.71 7823.52,4386.71 7831.86,4395.04 7831.86,4535.71 7823.52,4544.04 7793.52,4544.04 7791.52,4546.04 7791.52,4620.37 7793.52,4622.37 7830.74,4622.37 v2(7889.37,4563.74) ; v2@7878.37,4563.74 ccw(c7851.82,4563.74) 7870.59,4582.52 ccw(c7889.37,4601.3) v2@7889.37,4574.74 ; v2@7882.37,4563.74 ccw(c7865.47,4563.74) 7877.42,4575.69 ccw(c7889.37,4587.64) v2@7889.37,4570.74
  MidLayer2 w4: v1@5643.81,4887.32 ccw(c5627.59,4871.11) 5627.59,4894.04 ccw(c5627.59,4916.98) v1@5643.81,4900.76 ; v1@5646.64,4890.15 ccw(c5637.25,4880.76) 5637.25,4894.04 ccw(c5637.25,4907.32) v1@5646.64,4897.93 ; v1(5650.52,4894.04) 5625.96,4894.04 5615.19,4904.81 5615.19,4950.04 5648.52,4983.37 5657.35,4992.2 5953.34,4992.2 5962.17,4983.37 6020.5,4925.04 6103.88,4925.04 6111.38,4917.54 6197.69,4917.54 6208.97,4906.26 v1(6281.86,4833.37) ; v1@6272.36,4833.37 ccw(c6249.42,4833.37) 6265.64,4849.59 ccw(c6281.86,4865.81) v1@6281.86,4842.87 ; v1@6276.36,4833.37 ccw(c6263.08,4833.37) 6272.47,4842.76 ccw(c6281.86,4852.15) v1@6281.86,4838.87 ; v1@6795.52,4845.87 cw(c6795.52,4822.94) 6811.74,4839.16 cw(c6827.96,4855.37) v1@6805.02,4855.37 ; v1@6795.52,4849.87 cw(c6795.52,4836.6) 6804.91,4845.99 cw(c6814.3,4855.37) v1@6801.02,4855.37 ; v1(6795.52,4855.37) 6859.19,4791.71 6859.4,4791.5 7118.12,4791.5 7177.82,4851.21 7254.09,4851.21 7261.26,4858.37 7483.19,4858.37 7649.85,4691.71 7823.52,4691.71 7854.96,4660.27 7854.96,4598.15 v2(7889.37,4563.74) ; v2@7878.37,4563.74 ccw(c7851.82,4563.74) 7870.59,4582.52 ccw(c7889.37,4601.3) v2@7889.37,4574.74 ; v2@7882.37,4563.74 ccw(c7865.47,4563.74) 7877.42,4575.69 ccw(c7889.37,4587.64) v2@7889.37,4570.74
  Bottom Layer w4: v1(5782.69,2796.8) 5800.89,2815 5953.29,2815 5982.33,2844.04 6312.19,2844.04 6326.52,2858.37 6420,2858.37 6428.37,2850 6604.53,2850 6630.49,2824.04 6824.9,2824.04 7150.9,3150.04 7206.86,3150.04 7215.19,3158.37 v1(7215.19,3266.71) ; v1@5782.69,2802.3 ccw(c5782.69,2815.58) 5792.08,2806.19 ccw(c5801.47,2796.8) v1@5788.19,2796.8 ; v1@5782.69,2806.3 ccw(c5782.69,2829.24) 5798.91,2813.02 ccw(c5815.13,2796.8) v1@5792.19,2796.8 ; v1@6658.47,3390.99 cw(c6642.26,3374.77) 6665.19,3374.77 cw(c6688.13,3374.77) v1@6671.91,3390.99 ; v1@6661.3,3393.82 cw(c6651.91,3384.43) 6665.19,3384.43 cw(c6678.47,3384.43) v1@6669.08,3393.82 ; v1(6665.19,3397.71) 6665.19,3366.71 6695.52,3336.37 6823.52,3336.37 6837.19,3350.04 7131.86,3350.04 v1(7181.86,3300.04) ; v1@7172.36,3300.04 ccw(c7149.42,3300.04) 7165.64,3316.26 ccw(c7181.86,3332.48) v1@7181.86,3309.54 ; v1@7176.36,3300.04 ccw(c7163.08,3300.04) 7172.47,3309.43 ccw(c7181.86,3318.82) v1@7181.86,3305.54 ; v1@7208.47,3259.99 cw(c7192.26,3243.77) 7215.19,3243.77 cw(c7238.13,3243.77) v1@7221.91,3259.99 ; v1@7211.3,3262.82 cw(c7201.91,3253.43) 7215.19,3253.43 cw(c7228.47,3253.43) v1@7219.08,3262.82 ; v1(7356.86,3509.37) 7448.52,3601.04 7448.52,3750.04 7581.86,3883.37 7581.86,3941.71 7631.86,3991.71 v1(7748.52,3991.71) ; v1@7356.86,3514.87 ccw(c7356.86,3528.15) 7366.25,3518.76 ccw(c7375.64,3509.37) v1@7362.36,3509.37 ; v1@7356.86,3518.87 ccw(c7356.86,3541.81) 7373.07,3525.59 ccw(c7389.29,3509.37) v1@7366.36,3509.37 ; v1@7741.81,3984.99 ccw(c7725.59,3968.77) 7725.59,3991.71 ccw(c7725.59,4014.64) v1@7741.81,3998.43 ; v1@7744.64,3987.82 ccw(c7735.25,3978.43) 7735.25,3991.71 ccw(c7735.25,4004.99) v1@7744.64,3995.6
DB_MEM.BUS_A7: U7.C3 U8.J21 U12.30 U13.30 U16.18 U17.18 U61.92 | length 10237.7
  Top Layer w4: U8.J21@5685.28,4367.17 v3(5704.96,4386.85) ; U8.J21@5685.28,4374.51 ccw(c5685.28,4392.23) 5697.81,4379.7 ccw(c5710.34,4367.17) U8.J21@5692.62,4367.17 ; U8.J21@5685.28,4374.67 ccw(c5685.28,4392.77) 5698.08,4379.97 ccw(c5710.88,4367.17) U8.J21@5692.78,4367.17 ; U61.92@5764.02,2853.36 ccw(c5757.19,2860.19) 5766.85,2860.19 ccw(c5776.51,2860.19) U61.92@5769.68,2853.36 ; U61.92@5766.85,2837.34 5766.85,2871.05 5789.28,2893.49 5803.64,2893.49 v1(5818.52,2908.37) ; U17.18@6170.59,4435.28 6247.62,4435.28 6257.86,4425.04 ; U17.18@6193.81,4429.62 cw(c6207.46,4415.96) 6207.46,4435.28 cw(c6207.46,4454.59) U17.18@6193.81,4440.93 ; v1@6266.35,4420.2 ccw(c6257.86,4415.17) 6257.86,4425.04 ; v1@6266.35,4429.88 cw(c6257.86,4434.91) 6257.86,4425.04 ; v1(6274.52,4425.04) 6257.86,4425.04 ; U13.30@6619.41,3418.54 6673.02,3418.54 6676.85,3422.37 ; U13.30@6642.63,3412.89 cw(c6656.28,3399.23) 6656.28,3418.54 cw(c6656.28,3437.86) U13.30@6642.63,3424.2 ; v1(6642.86,3291.71) 6701.19,3350.04 6701.19,3398.04 6676.85,3422.37 ; v1@6642.86,3297.21 ccw(c6642.86,3310.49) 6652.25,3301.1 ccw(c6661.64,3291.71) v1@6648.36,3291.71 ; v1@6642.86,3301.21 ccw(c6642.86,3324.14) 6659.07,3307.93 ccw(c6675.29,3291.71) v1@6652.36,3291.71 ; v1@6691.81,3475.32 cw(c6675.59,3459.11) 6698.52,3459.11 cw(c6721.46,3459.11) v1@6705.24,3475.32 ; v1@6694.64,3478.15 cw(c6685.25,3468.76) 6698.52,3468.76 cw(c6711.8,3468.76) v1@6702.41,3478.15 ; v1(6698.52,3482.04) 6698.52,3444.04 6676.85,3422.37 ; v1(6801.52,4437.37) 6848.52,4437.37 6848.52,4435.28 U16.18@6845.59,4435.28 ; v1@6803.65,4437.37 cw(c6803.65,4410.89) U16.18@6822.37,4429.62 ; v1@6805.41,4433.49 cw(c6814.8,4424.1) 6814.8,4437.37 cw(c6814.8,4450.65) v1@6805.41,4441.26 ; v1@6808.24,4430.66 cw(c6824.46,4414.44) 6824.46,4437.37 cw(c6824.46,4460.31) v1@6808.24,4444.09 ; 6813.31,4437.37 cw(c6813.31,4420.55) U16.18@6825.2,4432.45 ; 6813.79,4437.37 ccw(c6813.79,4449.52) U16.18@6822.37,4440.93 ; v1(7210.86,3428.04) 7240.5,3428.04 7250,3418.54 U12.30@7294.41,3418.54 ; v1@7214.75,3424.15 cw(c7224.14,3414.76) 7224.14,3428.04 cw(c7224.14,3441.32) v1@7214.75,3431.93 ; v1@7217.57,3421.32 cw(c7233.79,3405.11) 7233.79,3428.04 cw(c7233.79,3450.98) v1@7217.57,3434.76 ; U12.30@7271.19,3412.89 ccw(c7257.54,3399.23) 7257.54,3418.54 ccw(c7257.54,3437.86) U12.30@7271.19,3424.2 ; 5692.16,4374.05 cw(c5704.96,4361.24) 5704.96,4379.35 ccw(c5704.96,4361.24) 5692.16,4374.05 ; 5692.16,4374.05 ccw(c5679.35,4386.85) 5697.46,4386.85 cw(c5679.35,4386.85) 5692.16,4374.05
  Top Layer w8: U7.C3@7909.06,4544.06 v2(7928.74,4563.74) ; U7.C3@7909.06,4550.06 ccw(c7909.06,4564.54) 7919.3,4554.3 ccw(c7929.54,4544.06) U7.C3@7915.06,4544.06 ; v2@7919.74,4563.74 cw(c7898.01,4563.74) 7913.38,4548.38 cw(c7928.74,4533.01) v2@7928.74,4554.74
  MidLayer1 w4: v3@5705.61,4394.32 ccw(c5707.19,4412.36) 5718.83,4398.49 ; v3@5712.43,4386.2 cw(c5730.47,4384.62) 5718.83,4398.49 ; 5781.77,4410.71 5767.84,4410.71 ; v1(5956.86,4423.37) 5944.2,4410.71 5920,4410.71 5910,4410.71 5861.38,4410.71 5841.96,4410.71 5767.84,4410.71 ; v1(6274.52,4425.04) 6291.19,4441.71 6307.86,4441.71 6324.52,4425.04 6525.49,4425.04 6551.32,4399.21 6681.44,4399.21 6719.61,4437.37 v1(6801.52,4437.37) 6857.67,4437.37 6870,4425.04 6904.19,4425.04 6931.86,4452.71 6931.86,4483.37 6981.86,4533.37 7025.19,4533.37 7158.52,4666.71 7158.52,4708.37 7141.86,4725.04 6989.86,4725.04 6973.52,4741.37 6973.52,4766.37 6990.52,4783.37 7133.52,4783.37 7181.86,4735.04 7181.86,4640.71 7098.52,4557.37 7098.52,4425.37 7131.86,4392.04 7131.86,4317.36 7125,4310.5 7123.52,4309.02 7123.52,4196.37 7057.52,4130.37 7057.52,3959.04 6973.52,3875.04 6973.52,3825.04 6965.19,3816.71 6881.86,3816.71 6856.86,3791.71 6856.86,3691.71 6815.19,3650.04 6815.19,3616.71 6798.52,3600.04 6781.86,3600.04 6709.52,3672.37 6662.52,3672.37 6648.52,3658.37 6648.52,3523.71 6690.19,3482.04 v1(6698.52,3482.04) ; v1@6274.52,4430.54 ccw(c6274.52,4443.82) 6283.91,4434.43 ccw(c6293.3,4425.04) v1@6280.02,4425.04 ; v1@6274.52,4434.54 ccw(c6274.52,4457.48) 6290.74,4441.26 ccw(c6306.96,4425.04) v1@6284.02,4425.04 ; 6668.08,3504.15 ccw(c6698.52,3534.6) v1@6698.52,3491.54 ; 6674.91,3497.32 ccw(c6698.52,3520.94) v1@6698.52,3487.54 ; 6681.74,3490.49 ccw(c6698.52,3507.28) v1@6698.52,3483.54 ; v1@6794.81,4430.66 ccw(c6778.59,4414.44) 6778.59,4437.37 ccw(c6778.59,4460.31) v1@6794.81,4444.09 ; v1@6797.64,4433.49 ccw(c6788.25,4424.1) 6788.25,4437.37 ccw(c6788.25,4450.65) v1@6797.64,4441.26 ; v1@6805.41,4433.49 cw(c6814.8,4424.1) 6814.8,4437.37 cw(c6814.8,4450.65) v1@6805.41,4441.26 ; v1@6808.24,4430.66 cw(c6824.46,4414.44) 6824.46,4437.37 cw(c6824.46,4460.31) v1@6808.24,4444.09 ; 5718.83,4398.49 cw(c5748.34,4368.98) 5748.34,4410.71 5767.84,4410.71
  MidLayer2 w4: v1@5811.81,2901.66 cw(c5795.59,2885.44) 5818.52,2885.44 cw(c5841.46,2885.44) v1@5825.24,2901.66 ; v1@5814.64,2904.49 cw(c5805.25,2895.1) 5818.52,2895.1 cw(c5831.8,2895.1) v1@5822.41,2904.49 ; v1(5818.52,2908.37) 5818.52,2879.71 5856.86,2841.37 6309.88,2841.37 6351.88,2883.37 v1(6473.52,2883.37) ; v1(5956.86,4423.37) 5971.86,4408.37 6043.17,4408.37 6054.17,4397.37 6106.86,4397.37 6134.52,4425.04 v1(6274.52,4425.04) ; v1@6267.81,4418.32 ccw(c6251.59,4402.11) 6251.59,4425.04 ccw(c6251.59,4447.98) v1@6267.81,4431.76 ; v1@6270.64,4421.15 ccw(c6261.25,4411.76) 6261.25,4425.04 ccw(c6261.25,4438.32) v1@6270.64,4428.93 ; v1@6466.81,2876.66 ccw(c6450.59,2860.44) 6450.59,2883.37 ccw(c6450.59,2906.31) v1@6466.81,2890.09 ; v1@6469.64,2879.49 ccw(c6460.25,2870.1) 6460.25,2883.37 ccw(c6460.25,2896.65) v1@6469.64,2887.26 ; v1(7210.86,3428.04) 7252.63,3469.82 7281.52,3498.71 7281.52,3871.73 7418.5,4008.71 7713.71,4008.71 7877.42,4172.42 7947.94,4172.42 7970.52,4195 v1(7970.52,4261.37) ; v1@7210.86,3433.54 ccw(c7210.86,3446.82) 7220.25,3437.43 ccw(c7229.64,3428.04) v1@7216.36,3428.04 ; v1@7210.86,3437.54 ccw(c7210.86,3460.48) 7227.07,3444.26 ccw(c7243.29,3428.04) v1@7220.36,3428.04 ; v1@7963.81,4254.66 cw(c7947.59,4238.44) 7970.52,4238.44 cw(c7993.46,4238.44) v1@7977.24,4254.66 ; v1@7966.64,4257.49 cw(c7957.25,4248.1) 7970.52,4248.1 cw(c7983.8,4248.1) v1@7974.41,4257.49
  Bottom Layer w4: v1@6466.81,2890.09 ccw(c6450.59,2906.31) 6473.52,2906.31 ccw(c6496.46,2906.31) v1@6480.24,2890.09 ; v1@6469.64,2887.26 ccw(c6460.25,2896.65) 6473.52,2896.65 ccw(c6486.8,2896.65) v1@6477.41,2887.26 ; v1(6473.52,2883.37) 6473.52,2912.06 6528.17,2966.71 6748.52,2966.71 6773.52,2991.71 6923.52,2991.71 6942.19,3010.37 6942.19,3239.71 6916.19,3265.71 6807.86,3265.71 6781.86,3291.71 v1(6642.86,3291.71) ; v1@6646.75,3287.82 cw(c6656.14,3278.43) 6656.14,3291.71 cw(c6656.14,3304.99) v1@6646.75,3295.6 ; v1@6649.57,3284.99 cw(c6665.79,3268.77) 6665.79,3291.71 cw(c6665.79,3314.64) v1@6649.57,3298.43 ; v1@6698.52,3472.54 cw(c6698.52,3449.61) 6714.74,3465.82 cw(c6730.96,3482.04) v1@6708.02,3482.04 ; v1@6698.52,3476.54 cw(c6698.52,3463.26) 6707.91,3472.65 cw(c6717.3,3482.04) v1@6704.02,3482.04 ; v1(6698.52,3482.04) 6730.52,3450.04 6837.21,3450.04 6862.88,3424.37 7207.19,3424.37 v1(7210.86,3428.04) ; 7179.07,3424.37 ccw(c7179.07,3459.83) v1@7204.14,3434.76 ; 7188.73,3424.37 ccw(c7188.73,3450.17) v1@7206.97,3431.93 ; 7196.77,3424.37 cw(c7196.77,3413.96) v1@7204.14,3421.32 ; 7198.39,3424.37 ccw(c7198.39,3440.51) v1@7209.8,3429.1 ; v2(7928.74,4563.74) 7948.38,4583.37 7978.86,4583.37 7987.19,4575.04 7987.19,4494.71 8040.19,4441.71 8040.19,4331.04 v1(7970.52,4261.37) ; v2@7928.74,4570.74 ccw(c7928.74,4587.64) 7940.69,4575.69 ccw(c7952.64,4563.74) v2@7935.74,4563.74 ; v2@7928.74,4574.74 ccw(c7928.74,4601.3) 7947.52,4582.52 ccw(c7966.3,4563.74) v2@7939.74,4563.74 ; v1@7970.52,4266.87 ccw(c7970.52,4280.15) 7979.91,4270.76 ccw(c7989.3,4261.37) v1@7976.02,4261.37 ; v1@7970.52,4270.87 ccw(c7970.52,4293.81) 7986.74,4277.59 ccw(c8002.96,4261.37) v1@7980.02,4261.37